# Altium PCB all-features.PcbDoc
Units mm, origin at the board's own origin, x right, y up, seen from the top; angles counter-clockwise.
Board outline 50 x 30 mm, 4 copper layers (Top Layer, Layer 1, Layer 2, Bottom Layer), stack 1.792 mm thick; 34 components, 18 nets, 116 pads, 44 vias.
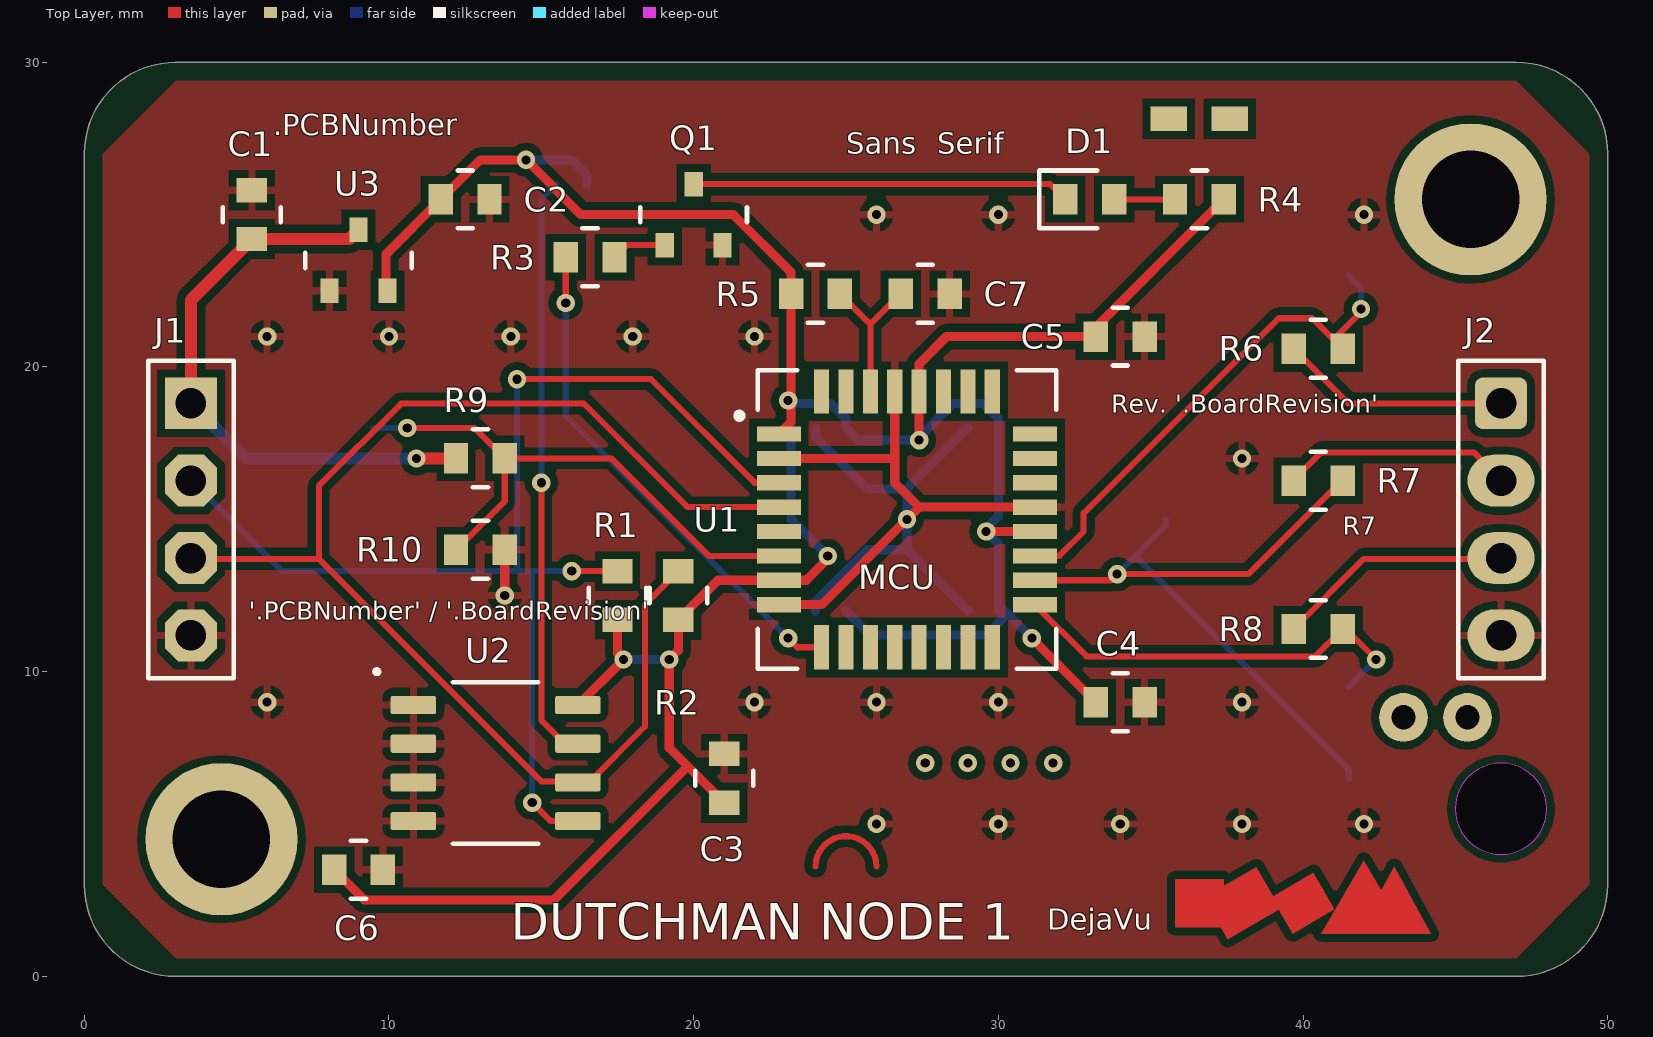
[diagram p0: Top Layer view]
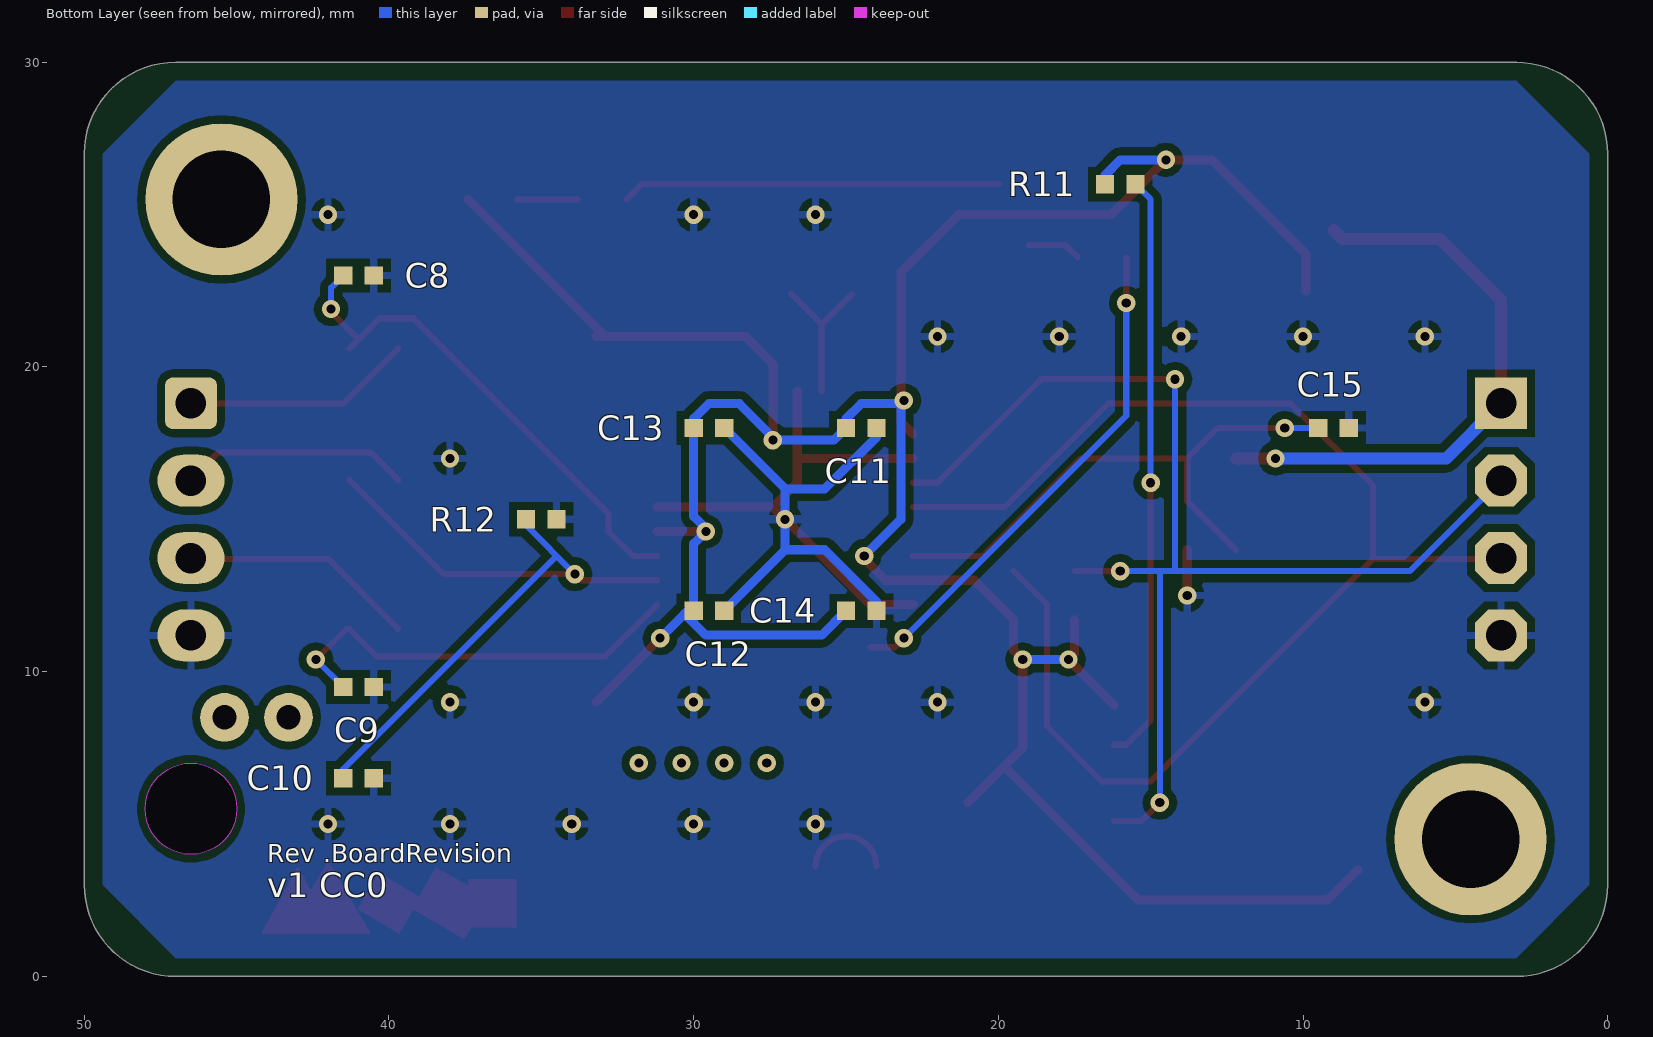
[diagram p1: Bottom Layer view, seen from below]
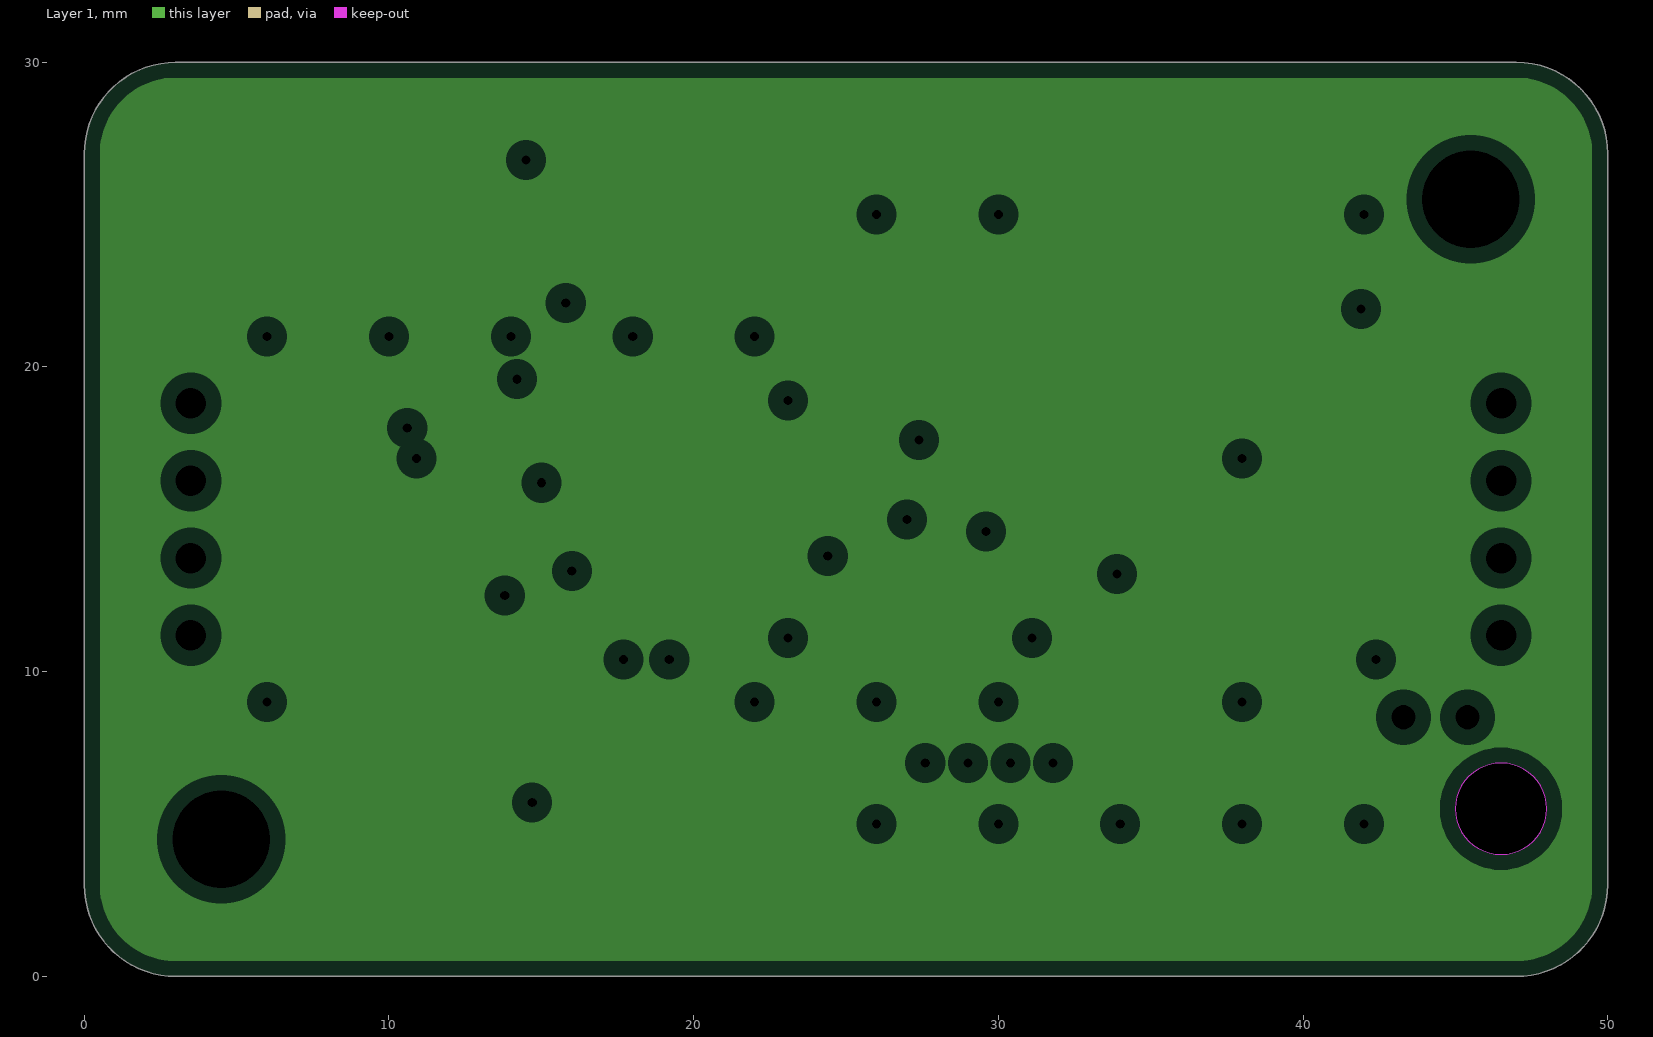
[diagram p2: Layer 1, clearances drawn from the general rule]
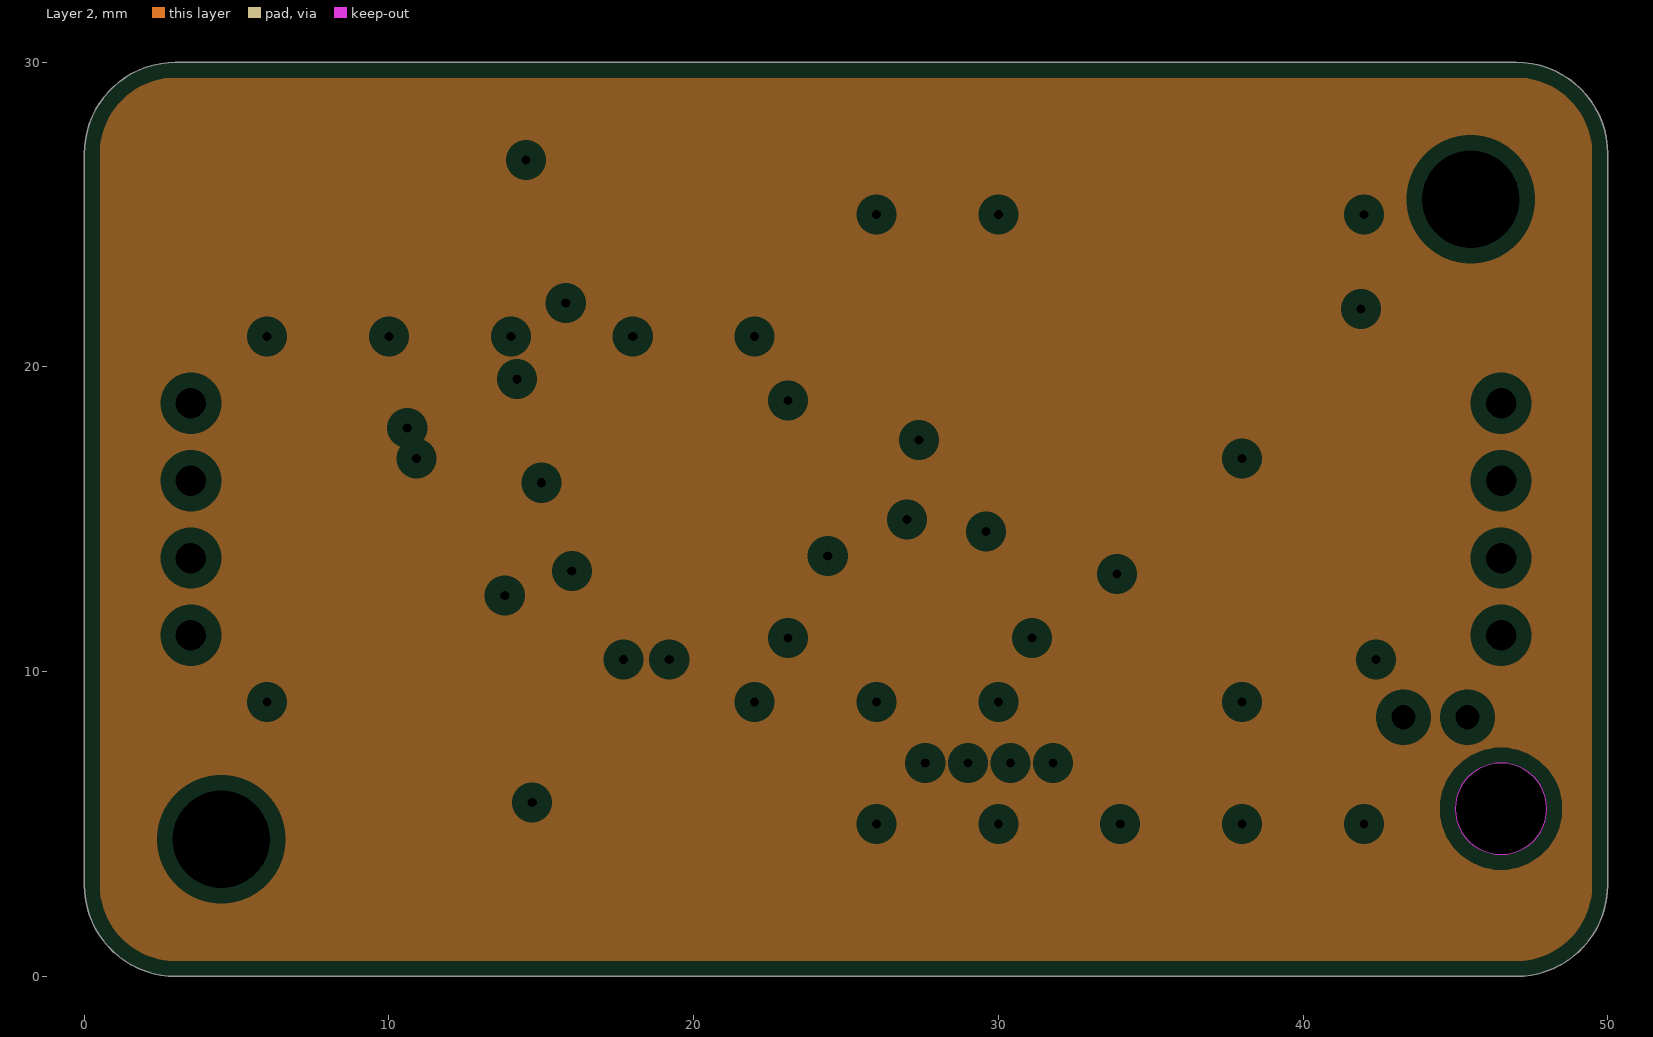
[diagram p3: Layer 2, clearances drawn from the general rule]

## Layer stack, top to bottom
Top Solder: solder mask 0.01, Solder Resist, Dk 3.5
Top Layer: signal copper 0.035
Dielectric 2: prepreg 0.0711, PP-006, Dk 4.1
Layer 1: plane copper 0.035, net GND
Dielectric 1: dielectric 1.51, FR-4, Dk 4.8
Layer 2: plane copper 0.035, net +3V3
Dielectric 3: prepreg 0.0711, PP-006, Dk 4.1
Bottom Layer: signal copper 0.035
Bottom Solder: solder mask 0.01, Solder Resist, Dk 3.5

## Board outline
3,0 cw(c3,3) 0,3 0,27 cw(c3,27) 3,30 47,30 cw(c47,27) 50,27 50,3 cw(c47,3) 47,0
cut-out: 45,5.5 ccw(c46.5,5.5) 46.5,4 ccw(c46.5,5.5) 48,5.5 ccw(c46.5,5.5) 46.5,7 ccw(c46.5,5.5)

## Design rules (kind name [scope] priority, off if disabled: settings)
Clearance [All] p1: gap=0.254 ignorepadtopadclearanceinfootprint=FALSE
HoleSize [All] p1: absolutevalues=TRUE maxlimit=3.5 minlimit=0.025 maxpercent=80.000 minpercent=20.000
PlaneClearance [All] p1: clearance=0.508
PlaneConnect [All] p1: planeconnectstyle=Relief reliefexpansion=0.508 reliefentries=4 reliefconductorwidth=0.254 reliefairgap=0.254
PolygonConnect [All] p1: connectstyle=Relief reliefconductorwidth=0.254 reliefentries=4 polygonreliefangle="90 Angle" airgapwidth=0.254
RoutingVias [All] p1: holewidth=0.711 width=1.27 viastyle="Through Hole" minholewidth=0.711 minwidth=1.27 maxholewidth=0.711 maxwidth=1.27
SolderMaskExpansion [All] p1: expansion=0.1 istentingtop=FALSE
Width [All] p1: maxlimit=0.5 minlimit=0.15 preferedwidth=0.2 minimp=50.000000 maximp=50.000000 favimp=50.000000
27 further rules are at their usual default settings.

## Components (designator, comment, footprint, x,y, rotation, side; value= is the part's Value field where it differs from the comment)
C1 "10u" C0603-DN 5.5,25 r90 top
C2 "10u" C0603-DN 12.5,25.5 r0 top
C3 "100n" C0603-DN 21,6.5 r90 top
C4 "100n" C0603-DN 34,9 r0 top
C5 "1u" C0603-DN 34,21 r0 top
C6 "100n" C0603-DN 9,3.5 r0 top
C7 "100n" C0603-DN 27.6,22.4 r0 top
C8 "10n" C0402-DN 41,23 r180 bottom
C9 "10n" C0402-DN 41,9.5 r180 bottom
C10 "10n" C0402-DN 41,6.5 r180 bottom
C11 "100n" C0402-DN 24.5,18 r180 bottom
C12 "100n" C0402-DN 29.5,12 r180 bottom
C13 "100n" C0402-DN 29.5,18 r180 bottom
C14 "1u" C0402-DN 24.5,12 r180 bottom
C15 "100n" C0402-DN 9,18 r180 bottom
D1 "GREEN" LED0603-DN 33,25.5 r0 top
J1 "PWR/I2C" HDR1X4-DN#1 3.5,15 r0 top
J2 "ANALOG" HDR1X4-DN#2 46.5,15 r0 top
Q1 "NPN" SOT23-DN 20,25 r0 top
R1 "4k7" R0603-DN 17.5,12.5 r90 top
R2 "4k7" R0603-DN 19.5,12.5 r90 top
R3 "1k" R0603-DN 16.6,23.6 r0 top
R4 "330" R0603-DN 36.6,25.5 r0 top
R5 "10k" R0603-DN 24,22.4 r0 top
R6 "1k" R0603-DN 40.5,20.6 r0 top
R7 "1k" R0603-DN 40.5,16.27 r0 top
R8 "1k" R0603-DN 40.5,11.4 r0 top
R9 "100k" R0603-DN 13,17 r0 top
R10 "100k" R0603-DN 13,14 r0 top
R11 "0" R0402-DN 16,26 r180 bottom
R12 "10k" R0402-DN 35,15 r180 bottom
U1 "MCU" TQFP32-DN 27,15 r0 top
U2 "EEPROM" SOIC8-DN 13.5,7 r0 top
U3 "3V3 LDO" SOT23-DN 9,23.5 r0 top

## Footprints (in the part's own frame and the unit in brackets; to place one, negate y for a bottom-side part, rotate by r counter-clockwise, add the part's x,y. Pads: shape width x height; smd on the part's side, far side on the other; paste and mask are expansions set on the pad)
C0402-DN [mm]
  rect 0.6x0.6 smd: 1(-0.5,0) 2(0.5,0)
  body extent -0.5,-0.25 0.5,0.25, height 0.5
C0603-DN [mm]
  rect 0.8x1 smd: 1(-0.8,0) 2(0.8,0)
  silkscreen extent -0.25,-0.95 0.25,0.95, body extent -0.8,-0.4 0.8,0.4, height 0.8
HDR1X4-DN#1 [mm]
  rect 1.7x1.7 hole 1: 1(0,3.81)
  oct 1.7x1.7 hole 1: 2(0,1.27) 3(0,-1.27) 4(0,-3.81)
  silkscreen extent -1.4,-5.21 1.4,5.21, body extent -1.27,-5.08 1.27,5.08, height 8.5
HDR1X4-DN#2 [mm]
  rrect30% 1.7x1.7 hole 1: 1(0,3.81)
  oval 2.2x1.7 hole 1: 2(0,1.27) 3(0,-1.27) 4(0,-3.81)
  silkscreen extent -1.4,-5.21 1.4,5.21, body extent -1.27,-5.08 1.27,5.08, height 2.5
LED0603-DN [mm]
  rect 0.8x1 smd: 1(-0.8,0) 2(0.8,0)
  silkscreen extent -1.65,-0.95 0.25,0.95, body extent -0.8,-0.4 0.8,0.4, height 0.6
R0402-DN [mm]
  rect 0.6x0.6 smd: 1(-0.5,0) 2(0.5,0)
  body extent -0.5,-0.25 0.5,0.25, height 0.35
R0603-DN [mm]
  rect 0.8x1 smd: 1(-0.8,0) 2(0.8,0)
  silkscreen extent -0.25,-0.95 0.25,0.95, body extent -0.8,-0.4 0.8,0.4, height 0.45
SOIC8-DN [mm]
  rrect25% 1.5x0.6 smd: 1(-2.7,1.905) 2(-2.7,0.635) 3(-2.7,-0.635) 4(-2.7,-1.905) 5(2.7,-1.905) 6(2.7,-0.635) 7(2.7,0.635) 8(2.7,1.905)
  silkscreen extent -3.97,-2.65 1.4,3.07, body extent -1.95,-2.45 1.95,2.45, height 1.75
SOT23-DN [mm]
  rect 0.6x0.8 smd: 1(-0.95,-1) 2(0.95,-1) 3(0,1)
  silkscreen extent -1.75,-0.25 1.75,0.25, body extent -1.45,-0.65 1.45,0.65, height 1.1
TQFP32-DN [mm]
  rect 1.45x0.5 smd: 1(-4.2,2.8) 2(-4.2,2) 3(-4.2,1.2) 4(-4.2,0.4) 5(-4.2,-0.4) 6(-4.2,-1.2) 7(-4.2,-2) 8(-4.2,-2.8) 17(4.2,-2.8) 18(4.2,-2) 19(4.2,-1.2) 20(4.2,-0.4) 21(4.2,0.4) 22(4.2,1.2) 23(4.2,2) 24(4.2,2.8)
  rect 0.5x1.45 smd: 9(-2.8,-4.2) 10(-2,-4.2) 11(-1.2,-4.2) 12(-0.4,-4.2) 13(0.4,-4.2) 14(1.2,-4.2) 15(2,-4.2) 16(2.8,-4.2) 25(2.8,4.2) 26(2,4.2) 27(1.2,4.2) 28(0.4,4.2) 29(-0.4,4.2) 30(-1.2,4.2) 31(-2,4.2) 32(-2.8,4.2)
  silkscreen extent -5.6,-4.9 4.9,4.9, body extent -3.5,-3.5 3.5,3.5, height 1.2

## Free pads (board coordinates)
  round 5 hole 3.2: 0(4.5,4.5) 0(45.5,25.5)
  rect 1.2x0.8 smd mask+0.2: M1(35.6,28.15)
  rect 1.2x0.8 smd mask+0.1: M2(37.6,28.15)
  round 1.6 hole 0.8 mask+0.2: M3(43.3,8.5)
  round 1.6 hole 0.8 mask+0.1: M4(45.4,8.5)

## Via types
v1: diameter 0.6, hole 0.3, Top Layer to Bottom Layer, 41 vias
v2: diameter 0.6, hole 0.3, Top Layer to Bottom Layer, tented both sides, 1 vias
v3: diameter 0.6, hole 0.3, Top Layer to Bottom Layer, tented bottom, 1 vias
v4: diameter 0.6, hole 0.3, Top Layer to Bottom Layer, tented top, 1 vias

## Nets (pads, with @x,y where several pads share a name; then routed paths per layer and width w, separated by ;. In a path a pad name is that pad's centre, name@x,y a point inside that pad or via, vN(x,y) a via of type N, cw(c..) or ccw(c..) an arc to the next point about the centre after c; other vN are vias at no path point)
+3V3: C2.1 C3.1 C4.1 C5.1 C6.1 C11.1 C12.1 C13.1 C14.1 R1.1 R2.1 R4.2 R5.1 R11.1 U1.1 U1.7 U1.20 U1.28 U2.8 U3.2 | length 104.6
  Top Layer w0.3: C6.1 9.2,2.5 15.4,2.5 19.8,6.9 ; U3.2@9.9,22.5 9.9,23.7 C2.1 13,26.8 v1(14.5,26.8) 16.3,25 21.3,25 23.2,23.1 R5.1 23.2,18.2 U1.1 ; U2.8@16.2,8.9 v1(17.7,10.4) 17.5,10.6 R1.1 ; C3.1 19.2,7.5 v1(19.2,10.4) 19.5,10.7 R2.1 20.8,13 U1.7 23.7,13 24.4,13.7 v1(24.4,13.8) ; v1(23.1,18.9) v1@23.2,19 ; v1(27.4,17.6) U1.28 27.4,20.1 28.3,21 C5.1 ; v1(29.6,14.6) U1.20 ; v1(31.1,11.1) C4.1 ; C5.1@32.9,21 R4.2
  Bottom Layer w0.3: v1(14.5,26.8) 16,26.8 16.5,26.3 R11.1 ; v1(17.7,10.4) v1(19.2,10.4) ; v1(23.1,18.9) v1@23.2,18.8 ; v1(24.4,13.8) 23.2,15 v1@23.2,18.8 ; C14.1 25.8,11.2 29.6,11.2 30.3,11.9 ; v1@27.3,17.6 28.5,18.8 29.5,18.8 30,18.3 C13.1 30,15.1 29.6,14.7 v1(29.6,14.6) 30,14.2 C12.1 ; v1(27.4,17.6) 25.4,17.6 C11.1 25,18.3 24.5,18.8 v1@23.2,18.8 ; C12.1@30,12.2 v1(31.1,11.1)
AIN1: C9.1 R8.2 U1.17 | length 14
  Top Layer w0.2: U1.17 32.9,10.5 40.4,10.5 R8.2 41.4,11.4 v1(42.4,10.4)
  Bottom Layer w0.2: C9.1 v1(42.4,10.4)
AIN2: C10.1 R7.2 R12.1 U1.18 | length 24.1
  Top Layer w0.2: U1.18 33.7,13 v1(33.9,13.2) 38.2,13.2 R7.2@41.3,16.3
  Bottom Layer w0.2: v1(33.9,13.2) 35.5,14.8 R12.1 ; 34.5,13.8 41.5,6.8 C10.1
AIN3: C8.1 R6.2 U1.19 | length 16.7
  Top Layer w0.2: U1.19 32,13.8 32.8,14.6 32.8,15.2 39.2,21.6 40.3,21.6 R6.2 ; R6.2@41,20.9 41.9,21.8 v1(41.9,21.9)
  Bottom Layer w0.2: C8.1 41.9,22.6 v1(41.9,21.9)
GND: C1.2 C2.2 C3.2 C4.2 C5.2 C6.2 C7.2 C8.2 C9.2 C10.2 C11.2 C12.2 C13.2 C14.2 C15.2 J1.4 J2.4 Q1.2 R10.2 R12.2 U1.2 U1.8 U1.21 U1.29 U2.1 U2.2 U2.3 U2.4 U3.1 | length 34.8
  Top Layer w0.3: v1(13.8,12.5) R10.2 ; U1.8 24.2,12.2 v1(27,15) 27.4,15.4 ; U1.2 26.6,17 ; U1.29 26.6,16.2 27.4,15.4 ; U1.21 27.4,15.4
  Bottom Layer w0.3: C14.2 24,12.3 25.7,14 27,14 ; C11.2 24,17.7 25.7,16 27,16 ; C12.2 27,14 ; C13.2 27,16 ; 27,14 v1(27,15) 27,16
  other v1: 26,5 30,5 34,5 38,5 42,5 6,9 22,9 26,9 30,9 38,9 38,17 6,21 10,21 14,21 18,21 22,21 26,25 30,25 42,25
IN1: J2.3 R8.1 | length 7.8
  Top Layer w0.2: R8.1 42,13.7 J2.3@46.5,13.7
IN2: J2.2 R7.1 | length 7.5
  Top Layer w0.2: R7.1@39.7,16.3 40.6,17.2 45.6,17.2 J2.2@46.5,16.3
IN3: J2.1 R6.1 | length 7.5
  Top Layer w0.2: R6.1 41.5,18.8 J2.1@46.5,18.8
LED_A: D1.2 R4.1 | length 2
  Top Layer w0.2: D1.2 R4.1
LED_CTRL: R3.1 U1.9 | length 16.7
  Top Layer w0.2: v1(15.8,22.1) R3.1 ; v1(23.1,11.1) 23.4,10.8 U1.9
  Bottom Layer w0.2: v1(15.8,22.1) 15.8,18.4 v1(23.1,11.1)
LED_K: D1.1 Q1.3 | length 12.4
  Top Layer w0.2: Q1.3 31.7,26 D1.1
NRST: C7.1 R5.2 U1.30 | length 5
  Top Layer w0.2: R5.2 25.8,21.4 ; U1.30 25.8,21.4 ; C7.1 25.8,21.4
Q1_B: Q1.1 R3.2 | length 1.8
  Top Layer w0.2: R3.2 17.8,24 Q1.1@19,24
SCL: J1.3 R2.2 U1.4 U2.6 | length 44.3
  Top Layer w0.2: J1.3@3.5,13.7 7.7,13.7 ; R2.2 18.4,12.2 18.4,8.2 16.6,6.4 16.2,6.4 15,6.4 7.7,13.7 ; U1.4 19.8,15.4 16.4,18.8 10.4,18.8 7.7,16.1 7.7,13.7
SDA: J1.2 R1.2 U1.3 U2.5 | length 40.9
  Top Layer w0.2: v1(14.2,19.6) 18.6,19.6 22,16.2 U1.3 ; v1(14.7,5.7) 15.3,5.1 U2.5@16.2,5.1 ; v1(16,13.3) R1.2
  Bottom Layer w0.2: J1.2@3.5,16.3 6.5,13.3 v1(16,13.3) ; 14.2,13.3 v1(14.2,19.6) ; v1(14.7,5.7) 14.7,13.3
VIN: C1.1 J1.1 R9.1 U3.3 | length 19.3
  Top Layer w0.4: J1.1@3.5,18.8 3.5,22.2 C1.1 8.7,24.2 U3.3 ; v1(10.9,17) R9.1
  Bottom Layer w0.4: J1.1@3.5,18.8 5.3,17 v1(10.9,17)
VSENSE: C15.1 R9.2 R10.1 U1.6 | length 18.7
  Top Layer w0.2: v1(10.6,18) 12.8,18 R9.2 ; R10.1 13.8,15.6 R9.2 ; U1.6 20.5,13.8 17.3,17 R9.2
  Bottom Layer w0.2: C15.1 v1(10.6,18)
WP: R11.2 U2.7 | length 19.3
  Top Layer w0.2: v1(15,16.2) 15,8.4 15.8,7.6 U2.7@16.2,7.6
  Bottom Layer w0.2: v1(15,16.2) 15,25.5 R11.2
pads on no net: U1.5 U1.10 U1.11 U1.12 U1.13 U1.14 U1.15 U1.16 U1.22 U1.23 U1.24 U1.25 U1.26 U1.27 U1.31 U1.32
copper on no net: | length 3.1
  Top Layer w0.2: 24,3.6 cw(c25,3.6) 26,3.6
  other v1: 31.8,7
  other v2: 30.4,7
  other v3: 29,7
  other v4: 27.6,7

## Polygon pours and split planes (outlines as drawn)
GND on Bottom Layer "Bottom Layer-GND" (solid, pour order 1): 0.6,3 3,0.6 47,0.6 49.4,3 49.4,27 47,29.4 3,29.4 0.6,27
GND on Top Layer "Top Layer-GND" (solid, pour order 0): 0.6,3 3,0.6 47,0.6 49.4,3 49.4,27 47,29.4 3,29.4 0.6,27
no net on Layer 2 (split plane): 47,29.49 47.163,29.49 47.487,29.447 47.802,29.362 48.103,29.238 48.386,29.074 48.645,28.876 48.876,28.645 49.074,28.386 49.238,28.103 49.362,27.802 49.447,27.487 49.49,27.163 49.49,27 49.49,3 49.49,2.837 49.447,2.513 49.362,2.198 49.238,1.897 49.074,1.614 48.876,1.355 48.645,1.124 48.386,0.926 48.103,0.762 47.802,0.638 47.487,0.553 47.163,0.51 2.837,0.51 2.513,0.553 2.198,0.638 1.897,0.762 1.614,0.926 1.355,1.124 1.124,1.355 0.926,1.614 0.762,1.897 0.638,2.198 0.553,2.513 0.51,2.837 0.51,3 0.51,27 0.51,27.163 0.553,27.487 0.638,27.802 0.762,28.103 0.926,28.386 1.124,28.645 1.355,28.876 1.614,29.074 1.897,29.238 2.198,29.362 2.513,29.447 2.837,29.49 3,29.49
no net on Layer 1 (split plane): 47,29.49 47.163,29.49 47.487,29.447 47.802,29.362 48.103,29.238 48.386,29.074 48.645,28.876 48.876,28.645 49.074,28.386 49.238,28.103 49.362,27.802 49.447,27.487 49.49,27.163 49.49,27 49.49,3 49.49,2.837 49.447,2.513 49.362,2.198 49.238,1.897 49.074,1.614 48.876,1.355 48.645,1.124 48.386,0.926 48.103,0.762 47.802,0.638 47.487,0.553 47.163,0.51 2.837,0.51 2.513,0.553 2.198,0.638 1.897,0.762 1.614,0.926 1.355,1.124 1.124,1.355 0.926,1.614 0.762,1.897 0.638,2.198 0.553,2.513 0.51,2.837 0.51,3 0.51,27 0.51,27.163 0.553,27.487 0.638,27.802 0.762,28.103 0.926,28.386 1.124,28.645 1.355,28.876 1.614,29.074 1.897,29.238 2.198,29.362 2.513,29.447 2.837,29.49 3,29.49

## Other copper
Top Layer:
  region: 39.657,1.394 41.043,2.194 40.343,3.406 38.957,2.606
  rectangle: 35.8,1.6 37.4,3.2
  region: 37.534,1.207 39.266,2.207 38.466,3.593 36.734,2.593
  region: 41.8,1.4 44.2,1.4 43,3.6
  region: 40.6,1.4 43.4,1.4 42,3.8

## Silkscreen, mask and mechanical layers (free items; w line width, h text height)
Top Overlay:
  text ".PCBNumber" at 6.2,27.6 h0.7
  text "Sans" at 25,27 h0.7
  text "Serif" at 28,27 h0.7
  text "Rev. '.BoardRevision'" at 33.7,18.5 h0.6
  text "'.PCBNumber' / '.BoardRevision'" at 5.4,11.7 h0.6
  text "DejaVu" at 31.6,1.3 h1.2
  text "DUTCHMAN NODE 1" at 14,1.2 h1.2
Bottom Overlay:
  text "Rev .BoardRevision" at 44,3.75 h0.6
  text "v1 CC0" at 44,2.6 h0.8
Mechanical 1:
  circle w0.1: c46.5,5.5 r2.2
  lines w0.1: 26,0.9 44,0.9
Mechanical 2:
  text "ASSY" at 30,4 h1
Mechanical 4:
  circle w0.1: c46.5,5.5 r1.5
Mechanical 13:
  region: 21,27.6 23,27.6 22,29